# Altium PCB 0.PCB1.PcbDoc (part 6 of 12)
Units mm, origin at the board's own origin, x right, y up, seen from the top; angles counter-clockwise.
Board outline 77 x 72 mm, 6 copper layers (Top Layer, Layer 1, Layer 3, Layer 4, Layer 2, Bottom Layer), stack 1.538 mm thick; 570 components, 490 nets, 3331 pads, 1909 vias.
Unrouted connection lines stored in the file: 2.
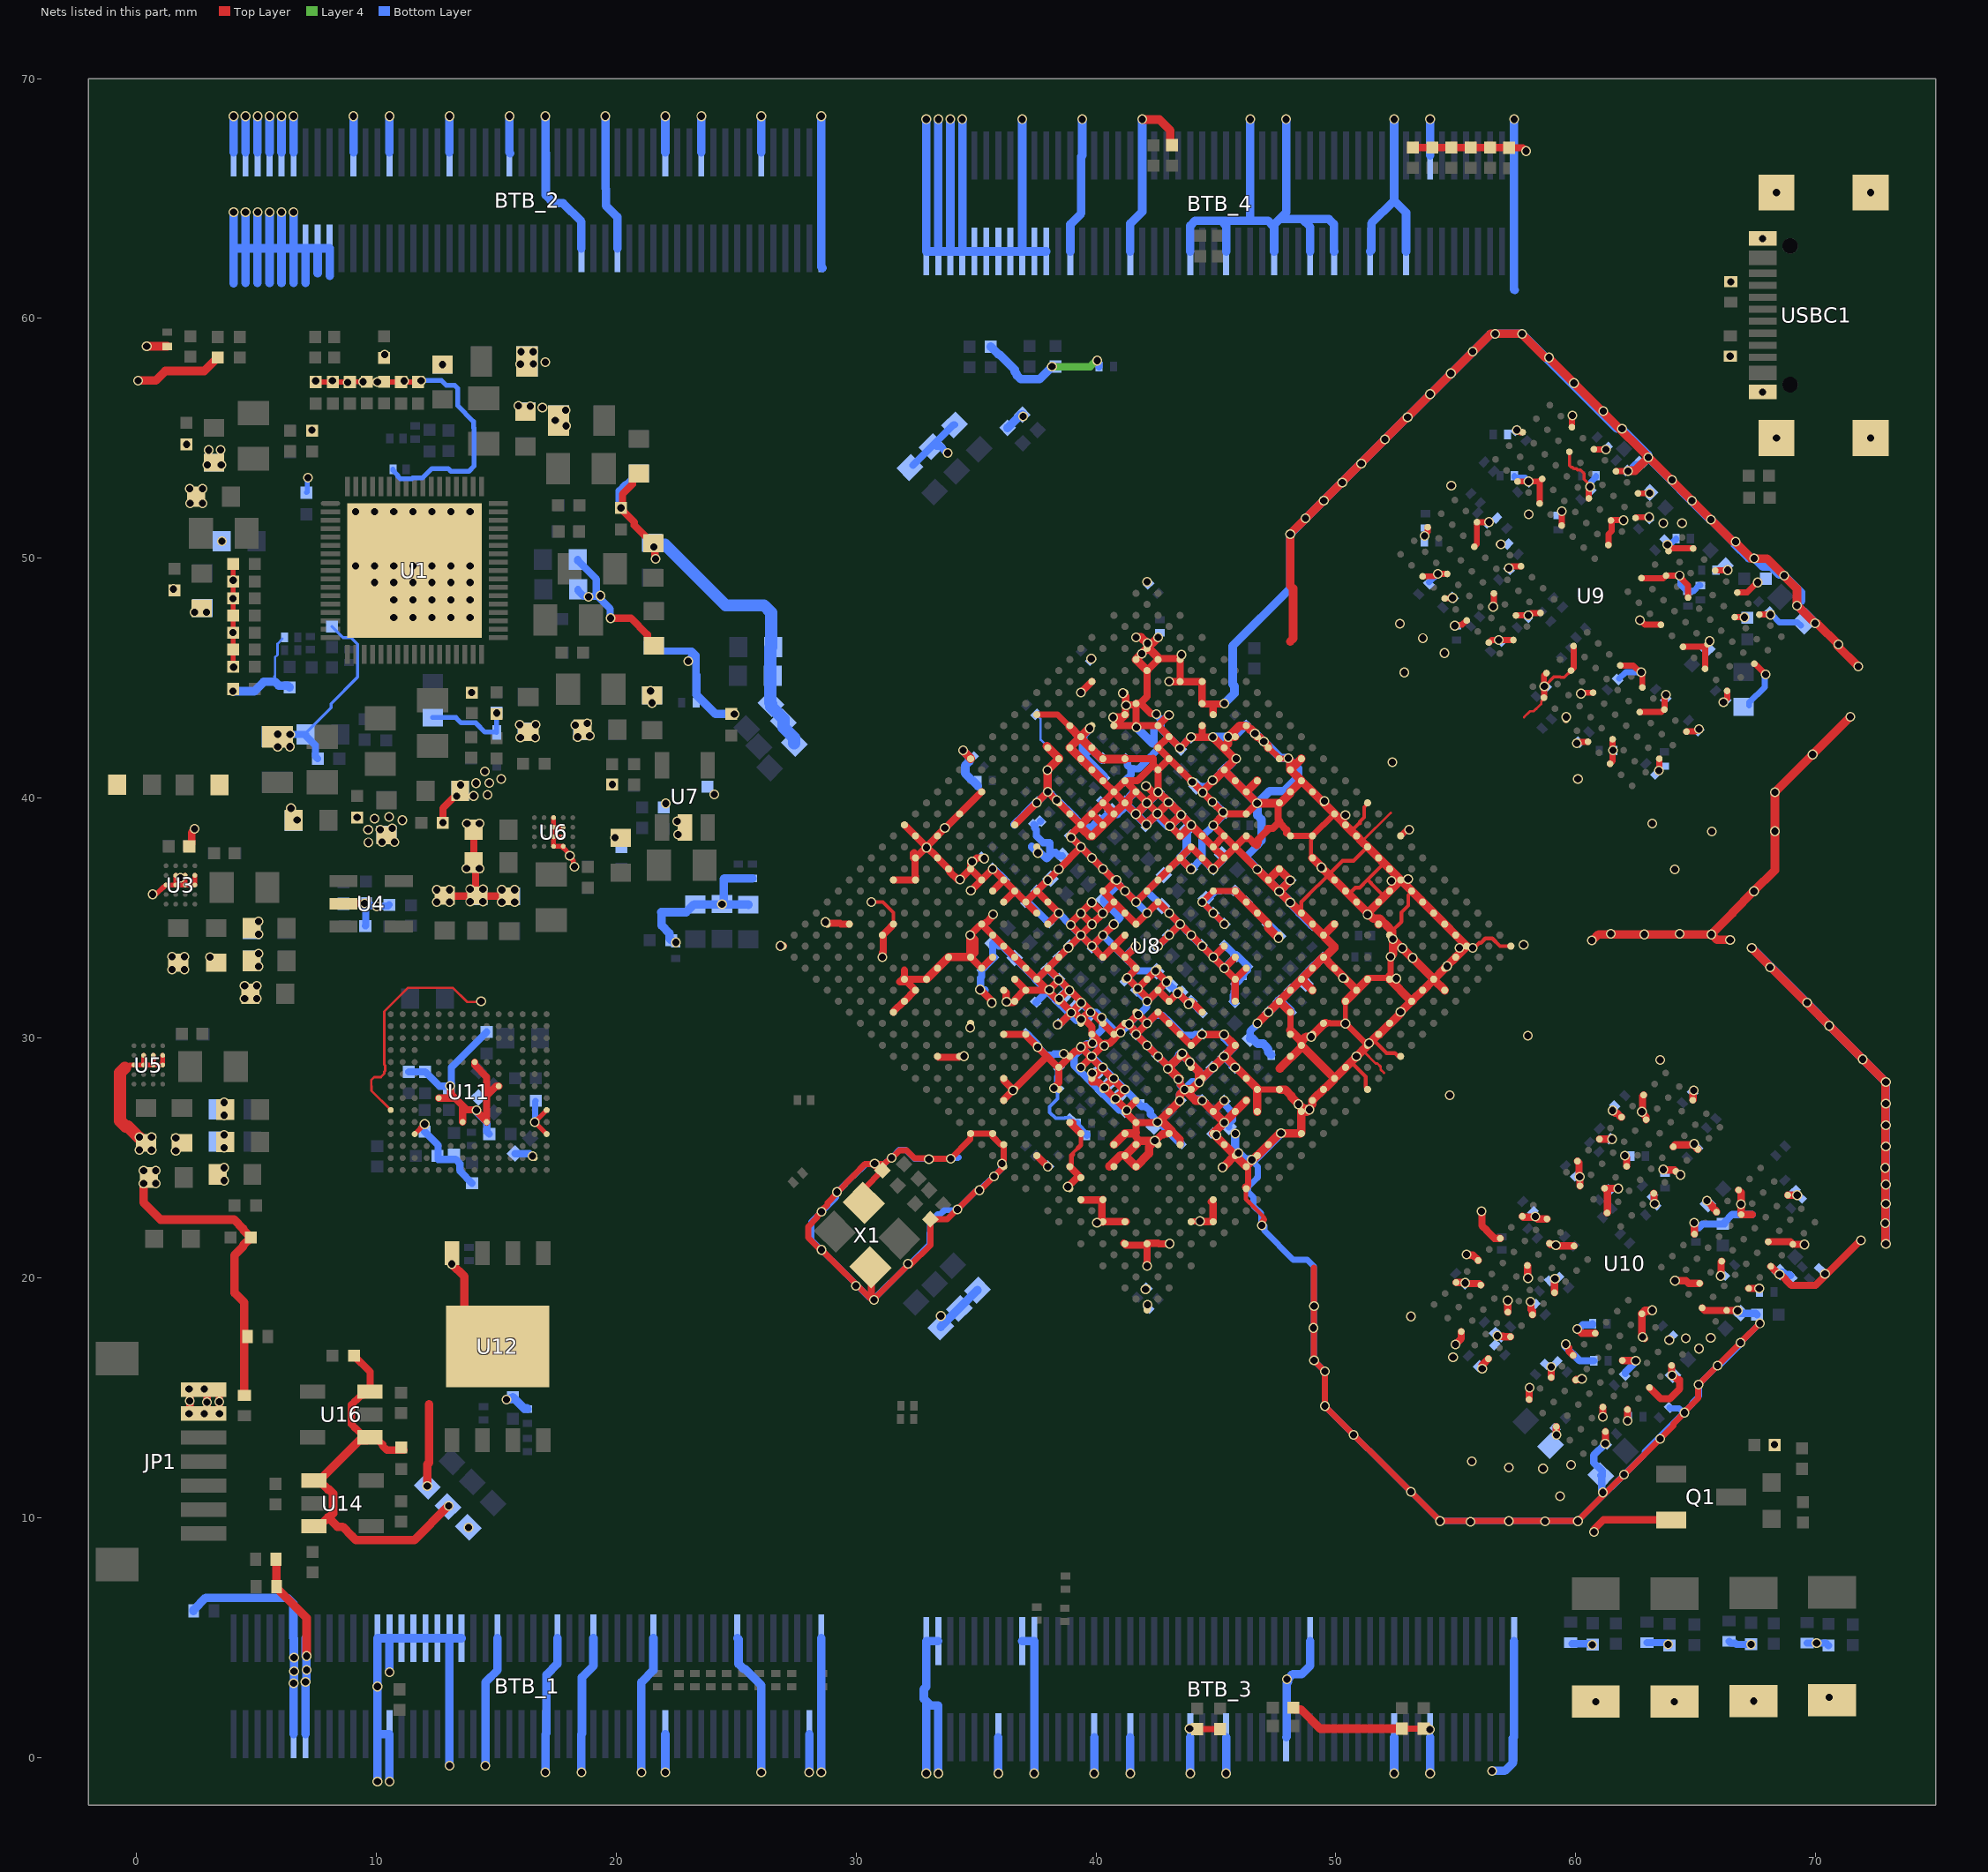
[diagram p10: the nets of this part, all layers, seen from the top]

## Via types
v1: diameter 0.41, hole 0.3, Top Layer to Bottom Layer, tented both sides, 1901 vias
v2: diameter 0.41, hole 0.3, Top Layer to Bottom Layer, 8 vias

## Nets (pads, with @x,y where several pads share a name; then routed paths per layer and width w, separated by ;. In a path a pad name is that pad's centre, name@x,y a point inside that pad or via, vN(x,y) a via of type N, cw(c..) or ccw(c..) an arc to the next point about the centre after c; other vN are vias at no path point) (continued)
GND: BTB_1.6 BTB_1.7 BTB_1.13 BTB_1.14 BTB_1.15 BTB_1.16 BTB_1.17 BTB_1.18 BTB_1.19 BTB_1.20 BTB_1.23 BTB_1.28 BTB_1.31 BTB_1.36 BTB_1.43 BTB_1.50 BTB_1.51 BTB_1.52 BTB_1.56 BTB_1.64 BTB_1.66 BTB_1.71 BTB_1.74 BTB_1.79 BTB_1.82 BTB_1.87 BTB_1.88 BTB_1.94 BTB_1.95 BTB_2.1 BTB_2.2 BTB_2.3 BTB_2.4 BTB_2.5 BTB_2.6 BTB_2.11 BTB_2.14 BTB_2.19 BTB_2.24 BTB_2.27 BTB_2.32 BTB_2.37 BTB_2.40 BTB_2.45 BTB_2.50 BTB_2.51 BTB_2.68 BTB_2.71 BTB_2.92 BTB_2.93 BTB_2.94 BTB_2.95 BTB_2.96 BTB_2.97 BTB_2.98 BTB_2.99 BTB_2.100 BTB_3.1 BTB_3.2 BTB_3.9 BTB_3.10 BTB_3.33 BTB_3.50 BTB_3.51 BTB_3.58 BTB_3.61 BTB_3.70 BTB_3.75 BTB_3.78 BTB_3.83 BTB_3.86 BTB_3.91 BTB_3.94 BTB_3.99 BTB_3.100 BTB_4.1 BTB_4.2 BTB_4.3 BTB_4.4 BTB_4.9 BTB_4.14 BTB_4.19 BTB_4.28 BTB_4.31 BTB_4.40 BTB_4.43 BTB_4.50 BTB_4.51 BTB_4.60 BTB_4.63 BTB_4.66 BTB_4.68 BTB_4.71 BTB_4.75 BTB_4.78 BTB_4.83 BTB_4.88 BTB_4.90 BTB_4.91 BTB_4.92 BTB_4.93 BTB_4.94 BTB_4.95 BTB_4.96 BTB_4.97 BTB_4.98 BTB_4.99 BTB_4.100 C1.2 C2.1 C3.2 C4.1 C5.1 C6.1 C7.1 C8.1 C11.1 C12.1 C13.1 C14.1 C15.1 C16.1 C17.1 C18.1 C19.2 C20.2 C21.1 C22.1 C23.1 C24.1 C27.1 C28.1 C29.1 C30.1 C31.1 C32.1 C33.1 C34.1 C35.1 C36.1 C37.2 C38.2 C39.1 C40.1 C41.1 C44.1 C45.1 C46.1 C47.1 C48.2 C49.2 C50.2 C51.1 C52.1 C53.1 C54.1 C56.1 C57.1 C58.1 C59.1 C60.1 C61.2 C62.2 C63.1 C64.1 C65.1 C66.1 C67.1 C68.1 C69.1 C72.1 C73.1 C74.1 C75.1 C76.1 C77.1 C78.1 C79.1 C80.1 C81.1 C83.1 C84.1 C85.1 C86.1 C87.1 C88.1 C89.1 C90.1 C91.2 C93.1 C94.1 C96.1 C97.1 C98.1 C99.1 C100.1 C101.1 C102.1 C103.1 C104.1 C105.1 C106.1 C107.1 C108.1 C109.1 C110.1 C111.1 C112.1 C113.1 C114.1 C115.1 C116.1 C117.1 C118.1 C119.1 C120.1 C121.1 C122.1 C123.1 C124.1 C125.1 C126.1 C127.1 C128.1 C129.1 C130.1 C131.1 C132.1 C133.1 C134.1 C135.1 C136.1 C137.1 C138.1 C139.1 C140.1 C141.1 C142.1 C143.1 C144.1 C145.1 C146.1 C147.1 C148.1 C149.1 C150.1 C151.1 C152.1 C153.1 C154.1 C155.1 C156.1 C157.1 C158.1 C159.1 C160.1 C161.1 C162.1 C163.1 C164.1 C165.1 C166.1 C167.1 C168.1 C169.1 C170.1 C171.1 C172.1 C173.1 C174.1 C175.1 C176.1 C177.1 C178.1 C179.1 C180.1 C181.1 C182.1 C183.1 C184.1 C185.1 C186.1 C187.1 C188.1 C189.1 C190.1 C191.1 C192.1 C193.1 C194.1 C195.1 C196.1 C197.1 C198.1 C199.1 C200.1 C201.1 C202.1 C203.1 C204.1 C205.1 C206.1 C207.1 C208.1 C209.1 C210.1 C211.1 C212.1 C213.1 C214.1 C215.1 C216.1 C217.1 C218.1 C219.1 C220.1 C221.1 C222.1 C223.1 C224.1 C225.1 C226.1 C227.1 C228.1 C229.1 C230.2 C231.2 C232.2 C233.2 C234.2 C237.1 C239.1 C240.1 C241.1 C242.2 C244.1 C245.1 C248.1 C249.1 C252.1 C253.1 C256.1 C257.1 C260.1 C262.1 C263.1 C264.1 C265.1 C266.1 C267.1 C270.1 C272.1 C273.1 C274.1 C277.1 C278.1 C279.1 C280.1 C281.1 C282.1 C283.1 C284.1 C285.1 C286.1 C287.1 C288.1 C291.1 C292.1 C293.1 C294.1 C295.1 C296.1 C297.1 C298.1 C299.1 C300.1 C301.1 C302.1 C303.1 C304.1 C305.1 C306.1 C307.1 C308.1 C309.1 C310.1 C311.1 C312.1 C313.1 C314.1 C315.1 C316.1 C317.1 C318.1 C319.1 C320.1 C321.1 C322.1 C323.1 C324.1 C325.1 C326.1 C327.1 C328.1 C329.1 C330.1 C331.1 C332.1 C333.1 C334.1 C335.1 C336.1 C337.1 C338.1 C339.1 C340.1 C341.1 C342.1 C343.1 C344.1 C345.1 C346.1 C347.1 C348.1 C349.1 C350.1 C351.1 C352.1 C353.1 C354.1 C355.1 C356.1 C357.1 C358.1 C359.1 C360.1 C361.1 C362.1 C363.1 C364.1 C365.1 C366.1 C367.1 C368.1 C369.1 C370.1 C371.1 C372.1 C373.1 C374.1 C375.1 C376.1 C377.1 C378.1 C379.1 C380.1 C381.1 C382.1 C383.1 C384.1 C385.2 C386.2 C387.2 C388.2 C389.2 C390.2 C391.2 C392.2 C393.1 C394.1 C395.1 C396.1 C397.1 C398.2 C399.2 C400.1 C401.1 C402.1 C403.1 JP1.6 JP1.7 Q1.2 R5.1 R9.1 R11.1 R13.1 R15.1 R17.1 R22.1 R23.1 R28.1 R40.1 R42.1 R50.1 R54.2 R55.2 R56.2 R57.2 R58.2 R59.2 R63.1 R64.1 R69.2 R70.2 R72.2 R73.2 R108.1 R120.1 R121.1 R124.1 R125.1 R134.1 R137.2 R139.2 R140.2 R141.2 R143.2 R144.2 R145.2 R146.2 SW1.1 SW2.1 SW3.1 SW4.1 U1.69 U2.2 U3.B2 U3.B3 U3.B4 U3.C1 U3.C2 U3.C3 U3.C4 U4.2 U5.B2 U5.B3 U5.B4 U5.C1 U5.C2 U5.C3 U5.C4 U6.B2 U6.B3 U6.B4 U6.C1 U6.C2 U6.C3 U6.C4 U7.2 U8.A1 U8.A11 U8.A14 U8.A34 U8.AA3 U8.AA6 U8.AA8 U8.AA10 U8.AA11 U8.AA16 U8.AA17 U8.AA18 U8.AA19 U8.AA20 U8.AA21 U8.AA22 U8.AA23 U8.AA24 U8.AA25 U8.AA26 U8.AA31 U8.AB3 U8.AB5 U8.AB6 U8.AB7 U8.AB8 U8.AB10 U8.AB11 U8.AB16 U8.AB17 U8.AB18 U8.AB19 U8.AB20 U8.AB24 U8.AB25 U8.AB26 U8.AB27 U8.AB29 U8.AB32 U8.AC3 U8.AC4 U8.AC5 U8.AC8 U8.AC10 U8.AC11 U8.AC12 U8.AC16 U8.AC20 U8.AC21 U8.AC24 U8.AC27 U8.AD5 U8.AD8 U8.AD10 U8.AD11 U8.AD12 U8.AD16 U8.AD20 U8.AD21 U8.AD24 U8.AD25 U8.AD26 U8.AE3 U8.AE4 U8.AE5 U8.AE6 U8.AE7 U8.AE8 U8.AE9 U8.AE11 U8.AE12 U8.AE13 U8.AE14 U8.AE15 U8.AE16 U8.AE18 U8.AE19 U8.AE20 U8.AE21 U8.AE24 U8.AE26 U8.AF4 U8.AF7 U8.AF8 U8.AF11 U8.AF12 U8.AF13 U8.AF14 U8.AF15 U8.AF16 U8.AF21 U8.AF22 U8.AF24 U8.AF25 U8.AF27 U8.AF28 U8.AF29 U8.AF30 U8.AF31 U8.AF32 U8.AG3 U8.AG6 U8.AG7 U8.AG10 U8.AG12 U8.AG15 U8.AG18 U8.AG21 U8.AG22 U8.AG30 U8.AH4 U8.AH8 U8.AH11 U8.AH12 U8.AH15 U8.AH21 U8.AH22 U8.AH23 U8.AJ3 U8.AJ7 U8.AJ8 U8.AJ9 U8.AJ11 U8.AJ12 U8.AJ15 U8.AJ16 U8.AJ18 U8.AJ21 U8.AJ22 U8.AJ23 U8.AJ30 U8.AK4 U8.AK5 U8.AK7 U8.AK10 U8.AK11 U8.AK12 U8.AK13 U8.AK14 U8.AK23 U8.AK28 U8.AK29 U8.AL3 U8.AL4 U8.AL5 U8.AL11 U8.AL13 U8.AL23 U8.AL25 U8.AM4 U8.AM8 U8.AM9 U8.AM18 U8.AM20 U8.AM22 U8.AM23 U8.AM24 U8.AM26 U8.AM28 U8.AM30 U8.AN7 U8.AN12 U8.AN23 U8.AN31 U8.AP1 U8.AP17 U8.AP23 U8.AP34 U8.B6 U8.B19 U8.B24 U8.B27 U8.B33 U8.C3 U8.C4 U8.C5 U8.C6 U8.C7 U8.C8 U8.C9 U8.C10 U8.C11 U8.C12 U8.C13 U8.C14 U8.C15 U8.C16 U8.C17 U8.C18 U8.C20 U8.C21 U8.C22 U8.C23 U8.C26 U8.C28 U8.C30 U8.C32 U8.D3 U8.D23 U8.D24 U8.D31 U8.E3 U8.E6 U8.E8 U8.E12 U8.E18 U8.E20 U8.E22 U8.E23 U8.E32 U8.F3 U8.F7 U8.F9 U8.F10 U8.F11 U8.F13 U8.F14 U8.F15 U8.F16 U8.F19 U8.F20 U8.F21 U8.F22 U8.F23 U8.F31 U8.G3 U8.G6 U8.G10 U8.G15 U8.G19 U8.G21 U8.G22 U8.G25 U8.G32 U8.H3 U8.H6 U8.H10 U8.H12 U8.H14 U8.H19 U8.H22 U8.H25 U8.H26 U8.H28 U8.H31 U8.J3 U8.J4 U8.J5 U8.J6 U8.J10 U8.J11 U8.J12 U8.J13 U8.J14 U8.J15 U8.J16 U8.J18 U8.J19 U8.J20 U8.J21 U8.J22 U8.J23 U8.J24 U8.J25 U8.J27 U8.J28 U8.J29 U8.J32 U8.K3 U8.K6 U8.K8 U8.K9 U8.K18 U8.K21 U8.K22 U8.K26 U8.K27 U8.K28 U8.K31 U8.K32 U8.L1 U8.L3 U8.L6 U8.L9 U8.L16 U8.L19 U8.L20 U8.L21 U8.L22 U8.L25 U8.L26 U8.L31 U8.M3 U8.M6 U8.M9 U8.M11 U8.M14 U8.M15 U8.M18 U8.M20 U8.M22 U8.M25 U8.M26 U8.M29 U8.M32 U8.N3 U8.N6 U8.N9 U8.N11 U8.N14 U8.N15 U8.N18 U8.N20 U8.N22 U8.N25 U8.N26 U8.N29 U8.N32 U8.P1 U8.P3 U8.P6 U8.P8 U8.P9 U8.P11 U8.P14 U8.P15 U8.P18 U8.P19 U8.P20 U8.P21 U8.P22 U8.P25 U8.P26 U8.P34 U8.R3 U8.R5 U8.R8 U8.R9 U8.R11 U8.R13 U8.R15 U8.R18 U8.R19 U8.R20 U8.R21 U8.R22 U8.R23 U8.R24 U8.R25 U8.R26 U8.R28 U8.R33 U8.T3 U8.T6 U8.T9 U8.T11 U8.T13 U8.T15 U8.T18 U8.T19 U8.T20 U8.T23 U8.T24 U8.T25 U8.T26 U8.T27 U8.T33 U8.U3 U8.U12 U8.U13 U8.U15 U8.U16 U8.U17 U8.U19 U8.U20 U8.U23 U8.U24 U8.U30 U8.U31 U8.U34 U8.V3 U8.V4 U8.V5 U8.V8 U8.V9 U8.V10 U8.V11 U8.V15 U8.V18 U8.V19 U8.V23 U8.V24 U8.V25 U8.V27 U8.V30 U8.W2 U8.W3 U8.W6 U8.W7 U8.W9 U8.W10 U8.W11 U8.W12 U8.W15 U8.W16 U8.W17 U8.W18 U8.W19 U8.W20 U8.W23 U8.W24 U8.W27 U8.Y3 U8.Y5 U8.Y6 U8.Y8 U8.Y9 U8.Y10 U8.Y11 U8.Y12 U8.Y13 U8.Y14 U8.Y15 U8.Y16 U8.Y17 U8.Y18 U8.Y19 U8.Y20 U8.Y23 U8.Y24 U8.Y28 U9.A3 U9.A10 U9.AB3 U9.AB5 U9.AB8 U9.AB10 U9.C1 U9.C5 U9.C8 U9.C12 U9.D2 U9.D4 U9.D9 U9.D11 U9.E1 U9.E5 U9.E8 U9.E12 U9.G1 U9.G3 U9.G5 U9.G8 U9.G10 U9.G12 U9.J1 U9.J3 U9.J10 U9.J12 U9.K2 U9.K4 U9.K9 U9.K11 U9.N2 U9.N4 U9.N9 U9.N11 U9.P1 U9.P3 U9.P10 U9.P12 U9.T1 U9.T3 U9.T5 U9.T8 U9.T10 U9.T12 U9.V1 U9.V5 U9.V8 U9.V12 U9.W2 U9.W4 U9.W9 U9.W11 U9.Y1 U9.Y5 U9.Y8 U9.Y12 U10.A3 U10.A10 U10.AB3 U10.AB5 U10.AB8 U10.AB10 U10.C1 U10.C5 U10.C8 U10.C12 U10.D2 U10.D4 U10.D9 U10.D11 U10.E1 U10.E5 U10.E8 U10.E12 U10.G1 U10.G3 U10.G5 U10.G8 U10.G10 U10.G12 U10.J1 U10.J3 U10.J10 U10.J12 U10.K2 U10.K4 U10.K9 U10.K11 U10.N2 U10.N4 U10.N9 U10.N11 U10.P1 U10.P3 U10.P10 U10.P12 U10.T1 U10.T3 U10.T5 U10.T8 U10.T10 U10.T12 U10.V1 U10.V5 U10.V8 U10.V12 U10.W2 U10.W4 U10.W9 U10.W11 U10.Y1 U10.Y5 U10.Y8 U10.Y12 U11.A6 U11.C4 U11.E7 U11.G5 U11.H10 U11.J5 U11.K8 U11.N2 U11.N5 U11.P4 U11.P6 U12.4 U12.9 U13.1 U14.1 U14.3 U15.1 U16.1 U16.3 U17.1 U18.1 U19.1 U20.1 U21.1 U22.1 U23.1 U24.1 U25.1 USBC1.13 USBC1.14 USBC1.15 USBC1.16 USBC1.A1B12 USBC1.B1A12 X1.2 X1.4 | length 1317.1
  Top Layer w0.102: U11.A6@10.602,26.991 9.796,27.797 9.796,27.996 9.788,28.004 9.788,28.238 9.915,28.364 9.982,28.364 10.192,28.365 10.335,28.507 10.335,28.601 10.366,28.633 10.366,28.849 10.335,28.88 10.335,31.101 11.324,32.091 13.191,32.091 13.781,31.5 14.342,31.5 v1(14.368,31.527) ; 51.093,38.192 52.281,39.381 52.293,39.381 ; 51.122,29.488 51.392,29.218 51.392,29.207 51.661,28.937 51.732,28.937 51.873,28.796 51.873,28.682 52.014,28.541 ; 57.847,43.369 58.097,43.618 58.247,43.618 58.346,43.717 58.36,43.717 58.564,43.921 58.564,44.025 58.676,44.137 U9.P1@58.676,44.185
  Top Layer w0.127: v1@58.658,44.778 58.676,44.76 58.688,44.748 58.788,44.748 59.086,45.046 59.364,45.046 59.371,45.038 59.529,45.038 U9.P3@59.807,45.317 ; U9.D11@59.737,54.438 59.737,53.869 59.811,53.795 59.87,53.795 59.938,53.726 60.031,53.726 60.074,53.684 60.202,53.684 60.35,53.536 60.35,53.293 60.548,53.094 v1@60.548,53.046
  Top Layer w0.142: v1(30.64,35.664) 31.117,35.664 31.559,35.222 U8.AK28@31.559,34.814 ; 39.034,25.144 39.034,25.197 39.243,25.406
  Top Layer w0.156: 46.407,23.122 46.998,22.532 46.998,22.439 ; U8.M9@48.565,35.205 48.565,35.671 49.239,36.345 49.245,36.345 49.651,36.752 49.651,36.853 ; U8.P6@48.965,37.539 48.965,38.237 48.997,38.269 48.997,38.394 U8.R5@49.025,38.422 ; 49.727,36.904 49.798,36.904 50.28,37.387 50.744,37.387 51.32,37.962 U8.M3@51.323,37.962 ; 50.566,36.015 50.815,36.264 50.996,36.264 51.329,36.598 ; 50.651,38.633 50.96,38.942 51.003,38.942 51.003,39.014 51.183,39.193 51.183,39.622 51.323,39.762 U8.P1@51.323,39.801 ; 50.722,28.903 51.247,28.379 51.247,27.926 U8.A14@51.323,27.85 ; 51.583,29.957 51.583,29.896 52.11,29.369 52.462,29.369 52.574,29.257 52.674,29.257 U8.A11@52.701,29.229 ; 51.918,37.367 51.918,37.186 51.329,36.598 ; 51.988,35.964 51.949,35.964 51.463,36.451 51.463,36.464 51.329,36.598 ; 52.132,34.642 52.132,34.664 ; 52.347,34.449 52.74,34.843 52.74,35.235 53.021,35.517 53.021,35.945 53.161,36.085 U8.H3@53.161,36.124 ; v1(55.705,33.758) 55.774,33.758 55.981,33.965 56.051,33.965 56.231,34.145 56.526,34.145 56.846,33.826 U8.A1@57.298,33.826
  Top Layer w0.182: U8.B24@46.248,23.721 46.248,23.282 46.407,23.122
  Top Layer w0.192: 39.243,25.406 39.372,25.535 U8.M29@39.372,26.012
  Top Layer w0.202: U8.L31@38.983,24.636 38.983,25.093 39.034,25.144
  Top Layer w0.203: -0.276,28.871 U5.C1@-0.101,28.871 U5.C2@0.299,28.871 ; U5.B2@0.299,29.271 U5.C2@0.299,28.871 ; v1(0.677,35.987) 0.717,36.027 0.857,36.027 1.111,36.281 1.142,36.281 U3.C1@1.237,36.376 U3.C2@1.637,36.376 ; U5.B3@0.699,29.271 U5.C3@0.699,28.871 ; U5.B4@1.099,29.271 U5.C4@1.099,28.871 U5.C3@0.699,28.871 ; U3.B2@1.637,36.776 U3.C2@1.637,36.376 ; U3.B3@2.037,36.776 U3.C3@2.037,36.376 ; U3.B4@2.437,36.776 U3.C4@2.437,36.376 U3.C3@2.037,36.376 ; C36.1@4.036,49.57 v1(4.036,49.083) C35.1@4.036,49.031 4.036,45.508 C21.1@4.041,45.503 ; v1(7.476,57.393) 7.521,57.348 C16.1@8.898,57.348 8.902,57.352 9.363,57.352 C2.1@9.366,57.355 ; v1(9.448,57.356) C2.1@9.609,57.355 9.612,57.353 10.043,57.353 v1(10.046,57.35) 10.048,57.353 10.316,57.353 10.32,57.348 C5.1@11.032,57.348 C15.1@11.743,57.348 11.794,57.4 v1(11.868,57.4) ; U11.C4@11.602,25.991 v1(12.014,26.403) ; U11.P4@17.102,25.991 v1(16.602,26.491) U11.P6@17.102,26.991 ; U6.C1@17.393,39.184 U6.C2@17.393,38.784 ; U6.B3@17.793,38.384 U6.C3@17.393,38.384 ; U6.B2@17.793,38.784 U6.C2@17.393,38.784 ; v1(18.259,37.131) 18.219,37.171 18.219,37.384 18.066,37.537 18.066,37.649 17.793,37.922 U6.B4@17.793,37.984 U6.C4@17.393,37.984 U6.C3@17.393,38.384 ; 42.819,25.906 42.866,25.953 42.964,25.953 43.023,26.012 43.028,26.016 43.045,26.016 43.156,26.127 43.175,26.147 ; U5.C2@0.299,28.871 U5.C3@0.699,28.871 ; U3.C2@1.637,36.376 U3.C3@2.037,36.376 ; U6.C3@17.393,38.384 U6.C2@17.393,38.784
  Top Layer w0.213: v1(50.4,30.599) 50.404,30.603 U8.E12@50.404,30.608 U8.F11@50.404,31.527
  Top Layer w0.254: 28.382,22.564 28.382,22.511 28.006,22.135 28.006,21.676 28.476,21.206 28.521,21.206 v1(28.565,21.162) 30.616,19.111 30.716,19.111 v1(30.754,19.073) ; v1@28.43,22.612 v1(28.565,22.747) 28.565,22.8 28.809,23.044 28.809,23.125 29.206,23.521 v1(29.206,23.574) ; v1@29.214,23.568 29.883,24.237 29.897,24.237 ; 29.901,24.254 29.901,24.269 30.372,24.739 31.179,24.739 31.442,25.002 v1(31.484,25.002) ; X1.4@30.32,23.121 30.32,23.697 C172.1@31.101,24.478 30.963,24.478 v1@30.701,24.739 ; v1@30.755,24.739 v1(30.776,24.76) ; v1@30.783,19.15 32.163,20.53 v1(32.163,20.577) ; v1@31.541,25.068 31.575,25.068 31.822,25.315 32.104,25.315 32.441,24.978 33.002,24.978 v1(33.04,24.941) ; v1@32.24,20.501 33.102,21.363 33.102,21.885 33.094,21.893 ; v1@33.04,24.953 33.941,24.953 34.768,25.78 34.768,26.003 U8.U34@34.777,26.012 U8.T33@35.687,26.012 ; 33.102,21.901 C174.1@33.102,22.44 33.807,22.44 34.213,22.847 v1(34.229,22.847) ; v1@34.23,22.846 34.999,23.615 35.118,23.615 v1(35.148,23.645) ; v1@35.161,23.633 v1(35.757,24.229) ; U8.T33@35.687,26.011 35.687,25.9 36.035,25.552 U8.R33@36.155,25.552 36.155,24.883 36.088,24.816 v1(36.088,24.763) ; v1@35.755,24.232 U8.P34@36.155,24.633 ; U8.AN12@37.534,43.477 38.399,43.477 U8.AL11@38.913,42.964 ; v1(43.911,1.192) 43.917,1.186 44.21,1.186 R121.1@44.216,1.18 R120.1@45.181,1.18 ; U8.C28@43.969,22.335 43.978,22.344 44.319,22.344 v1(44.334,22.358) ; v1(45.346,34.74) 45.346,34.746 44.433,35.659 v1(44.427,35.659) 44.427,35.662 U8.U12@44.888,36.123 U8.T11@45.807,36.123 ; U8.B24@46.267,23.778 46.35,23.861 46.35,24.538 46.267,24.621 U8.C23@46.267,24.633 ; U8.F19@46.724,27.844 U8.E18@47.525,27.844 ; v1(46.919,22.185) 46.949,22.215 46.949,22.358 47.014,22.423 46.998,22.439 ; U8.AA3@47.193,42.105 U8.Y3@47.646,41.653 ; U8.Y3@47.646,41.639 47.655,41.648 48.002,41.648 v1(48.015,41.661) ; 48.104,30.313 U8.H14@48.104,31.064 ; U8.T6@48.106,38.422 49.015,38.422 49.477,38.884 49.487,38.884 U8.R3@49.944,39.341 ; 49.092,20.419 v1(49.092,18.819) v1(49.092,16.559) v1(49.55,16.101) 49.55,14.647 v1(50.743,13.452) ; U8.F13@49.581,30.62 49.752,30.62 49.764,30.608 50.391,30.608 v1(50.4,30.599) 50.412,30.599 51.217,29.795 U8.C12@51.323,29.689 ; v1@50.764,13.435 51.946,12.253 51.95,12.253 v1(53.131,11.072) v1(54.35,9.853) v1(57.22,9.853) 58.71,9.853 v1(58.72,9.843) ; U8.F9@51.384,32.508 U8.E8@52.193,32.508 ; 52.217,32.611 52.288,32.683 v1(52.288,33.389) ; U8.L1@52.701,38.422 52.714,38.422 52.946,38.654 53.023,38.654 v1(53.053,38.684) ; R124.1@52.75,1.198 R125.1@53.664,1.198 53.68,1.182 53.902,1.182 v1(53.918,1.166) ; U9.C1@53.62,49.241 53.625,49.246 54.092,49.246 54.196,49.35 v1(54.249,49.35) 54.25,49.349 U9.D2@54.646,49.347 U9.D2@54.646,49.347 ; v1(53.708,50.925) 53.708,50.978 53.827,51.098 53.827,51.287 U9.A3@53.832,51.292 ; U9.E1@54.539,48.322 54.544,48.327 54.853,48.327 v1(54.872,48.346) ; v1(54.964,47.187) 55.001,47.224 55.273,47.224 55.452,47.402 U9.G1@55.459,47.402 ; U9.D4@55.777,50.478 55.777,50.485 55.883,50.592 U9.C5@55.883,51.504 56.377,51.504 v1(56.382,51.509) ; U9.J1@56.378,46.483 56.385,46.483 56.491,46.589 v1(56.789,46.589) U9.K2@57.403,46.589 ; v1(56.562,47.978) 56.585,48.001 56.585,48.529 U9.G3@56.59,48.534 ; U9.E5@56.802,50.584 56.88,50.584 v1(56.881,50.583) ; v1(57.212,49.59) 57.254,49.59 57.324,49.66 57.716,49.66 U9.G5@57.721,49.665 ; U9.J3@57.509,47.615 57.513,47.618 58.015,47.618 v1(58.018,47.622) ; v1(57.546,55.35) 57.589,55.35 57.682,55.256 57.787,55.256 U9.A10@57.792,55.251 ; U9.C8@57.58,53.201 v1(58.033,53.201) 58.492,53.201 ; v1@58.029,47.62 58.125,47.716 58.53,47.716 U9.K4@58.535,47.721 ; U9.E8@58.499,52.282 58.499,53.194 58.492,53.201 ; U9.D9@58.605,53.307 58.598,53.307 58.492,53.201 ; U9.P1@58.676,44.185 58.676,44.192 58.693,44.209 58.693,44.565 58.696,44.568 v1(58.696,44.656) ; v1@58.676,44.641 58.676,44.76 58.676,45.097 58.782,45.203 U9.N2@58.782,45.21 ; v1@58.719,9.853 v1(60.091,9.853) 63.526,13.288 64.07,13.832 64.07,13.909 v1(64.536,14.375) ; U9.G8@59.419,51.362 59.421,51.365 59.421,51.96 v1(59.424,51.963) ; U9.T1@59.595,43.266 59.595,43.368 v1(59.608,43.381) ; U9.P3@59.807,45.317 59.807,45.324 59.913,45.43 U9.N4@59.913,46.342 ; U9.C12@59.843,55.463 59.843,55.935 v1(59.862,55.954) ; v1(60.049,42.28) 60.102,42.28 60.164,42.342 60.51,42.342 U9.V1@60.515,42.347 ; v1(60.224,44.354) 60.266,44.354 60.305,44.392 60.722,44.392 U9.T3@60.727,44.397 ; U9.G10@60.55,52.494 60.55,52.933 v1(60.599,52.982) ; U9.E12@60.762,54.544 60.764,54.542 61.257,54.542 v1(61.26,54.539) ; U9.K9@61.363,50.549 61.368,50.554 61.368,51.008 61.497,51.137 U9.J10@61.497,51.585 ; U9.Y1@61.434,41.427 61.434,41.434 61.54,41.541 61.54,41.978 v1(61.559,41.997) ; U9.J10@61.469,51.574 61.474,51.579 61.491,51.579 U9.J10@61.497,51.585 ; v1@61.54,41.997 U9.W2@61.54,42.453 ; U9.G12@61.681,53.625 61.686,53.63 62.171,53.63 v1(62.176,53.634) ; U9.T5@61.858,45.529 62.405,45.529 62.688,45.246 v1(62.73,45.246) 62.73,45.204 62.777,45.156 U9.V5@62.777,44.609 ; v1(61.996,51.585) U9.J10@61.497,51.585 ; U9.K11@62.494,51.68 62.526,51.712 v1(63.062,51.712) ; U9.J12@62.6,52.706 63.085,52.706 63.085,52.712 v1(63.088,52.715) ; U9.W4@62.671,43.584 63.583,43.584 63.701,43.702 63.701,44.196 63.766,44.26 v1(63.766,44.303) ; v1(62.681,47.42) 62.875,47.226 U9.T8@63.555,47.226 ; U9.N9@62.742,49.17 63.654,49.17 63.76,49.276 U9.P10@63.767,49.276 64.323,49.276 v1(64.328,49.281) 64.328,49.228 64.681,48.874 64.681,48.362 U9.T10@64.686,48.357 ; v1(63.469,41.145) 63.479,41.156 63.479,41.635 U9.AB3@63.484,41.64 ; 63.986,50.408 U9.P12@64.899,50.408 ; U9.V8@64.474,46.306 65.387,46.306 ; v1@64.536,14.4 65.108,14.972 65.108,15.527 v1(65.122,15.541) ; U9.AB5@64.616,42.771 64.621,42.776 64.995,42.776 65.092,42.873 v1(65.145,42.873) ; v1@65.145,15.541 65.145,15.564 v1(65.915,16.335) ; U9.Y8@65.394,45.387 65.394,46.299 65.498,46.404 65.501,46.404 U9.W9@65.501,46.411 ; U9.W9@65.5,46.413 U9.W9@65.501,46.411 ; v1(65.578,46.546) 65.549,46.516 65.549,46.469 65.501,46.421 U9.W9@65.501,46.411 ; U9.T12@65.818,49.488 66.325,49.488 v1(66.339,49.502) ; v1@65.939,16.335 65.939,16.36 66.849,17.27 66.898,17.27 66.898,17.319 67.673,18.093 v1(67.674,18.093) ; v1(66.161,43.991) 66.313,44.142 U9.AB8@66.313,44.468 ; U9.W11@66.631,47.544 66.634,47.541 67.036,47.541 v1(67.038,47.539) ; U9.V12@66.737,48.569 67.155,48.569 67.576,48.99 v1(67.591,48.99) ; U9.AB10@67.444,45.599 67.449,45.594 67.478,45.594 v1(67.914,45.159) ; U9.Y12@67.657,47.649 v1(68.117,47.648)
  Top Layer w0.305: JP1.6@2.161,14.35 2.227,14.416 2.227,15.321 JP1.7@2.161,15.386 ; R22.1@2.203,37.982 2.3,38.08 2.3,38.566 2.42,38.685 v1(2.42,38.714) ; JP1.6@2.796,14.333 2.798,14.333 2.946,14.481 2.946,15.185 2.798,15.333 JP1.7@2.796,15.333 ; JP1.6@3.431,14.35 3.456,14.375 3.456,15.362 JP1.7@3.431,15.386 ; U4.2@8.633,35.593 8.641,35.601 9.508,35.601 v1(9.515,35.609) ; C399.2@9.073,16.747 9.743,16.077 U16.3@9.743,15.246 U16.3@9.616,15.246 ; U16.3@9.468,15.099 U16.3@9.616,15.246 ; U16.1@9.759,13.362 U16.1@9.743,13.346 ; C398.2@11.153,12.812 10.446,12.812 10.268,12.991 10.268,13.047 9.968,13.346 U16.1@9.743,13.346 ; U11.E7@12.602,27.491 13.272,27.491 ; v1(12.777,38.973) 12.777,39.573 13.225,40.021 13.275,40.021 13.315,40.061 C23.1@13.315,40.111 ; C97.1@12.847,35.927 12.859,35.915 C98.1@14.193,35.915 ; v1(13.08,27.989) 13.1,27.969 13.1,27.693 13.161,27.632 13.161,27.601 13.272,27.491 ; v1(13.352,40.074) C23.1@13.315,40.111 ; C23.1@13.498,40.294 C23.1@13.315,40.111 ; U11.G5@13.602,26.491 13.602,27.16 ; C103.1@14.064,38.682 C101.1@14.064,37.31 14.141,37.233 14.141,35.966 C98.1@14.193,35.915 ; U11.H10@14.102,28.991 14.102,28.87 14.602,28.37 14.602,27.583 ; v1(14.178,26.978) 14.157,26.998 13.764,26.998 13.602,27.16 ; v1@14.213,26.901 14.602,26.512 U11.J5@14.602,26.491 ; U11.J5@14.602,26.592 14.602,27.583 ; U11.K8@15.102,27.991 15.01,27.991 14.602,27.583 ; C99.1@15.539,35.902 15.526,35.915 C98.1@14.193,35.915 ; v1@19.73,47.503 19.734,47.5 v1(19.765,47.5) 20.615,47.5 21.3,46.815 21.3,46.573 21.523,46.351 C68.1@21.573,46.351 ; C8.1@20.143,52.156 20.229,52.156 20.268,52.195 20.268,52.673 20.675,53.08 20.675,53.305 20.898,53.527 C13.1@20.948,53.527 ; v1(20.201,52.098) 20.299,52 20.299,51.958 20.555,51.702 ; 20.556,51.702 20.756,51.502 20.756,51.373 C7.1@21.547,50.582 ; v1(21.577,50.473) 21.577,50.475 21.547,50.505 C7.1@21.547,50.632 21.547,50.473 21.556,50.473 21.62,50.409 21.62,49.997 v1(21.64,49.977) ; U8.AP34@26.963,33.826 U8.AP34@26.968,33.831 ; v1(28.724,34.827) 28.724,34.822 U8.AN31@28.801,34.745 ; U8.AN31@28.84,34.783 29.33,34.783 29.368,34.745 U8.AM30@29.721,34.745 ; X1.2@30.603,20.434 30.638,20.399 30.638,19.219 v1@30.716,19.142 ; U8.AJ30@31.109,33.475 31.109,33.554 31.132,33.577 31.132,34.253 U8.AK29@31.099,34.285 31.111,34.285 31.457,34.631 31.457,34.64 31.559,34.742 U8.AK28@31.559,34.745 ; U8.AF32@31.559,31.068 31.559,31.096 31.991,31.527 U8.AF31@32.019,31.527 ; U8.AM26@31.559,36.583 U8.AL25@32.462,36.583 ; U8.AG30@31.977,32.488 31.82,32.332 32.133,32.332 U8.AF30@32.478,31.987 ; U8.AF31@32.013,31.527 32.467,31.981 U8.AF30@32.476,31.981 ; 32.019,32.827 U8.AG30@32.019,32.447 U8.AF29@32.938,32.447 ; U8.AP23@32.019,38.881 U8.AN23@32.479,38.422 32.935,37.965 33.7,38.73 v1(33.7,38.75) ; 32.419,37.723 32.392,37.696 32.392,37.503 32.462,37.432 32.462,36.751 32.478,36.735 U8.AL25@32.478,36.583 ; U8.AM24@32.479,37.503 U8.AM23@32.938,37.962 33.16,37.74 33.176,37.74 33.398,37.518 U8.AL23@33.398,37.503 ; U8.AB32@33.398,29.229 33.436,29.191 34.279,29.191 U8.AA31@34.317,29.229 34.497,29.229 v1(34.506,29.238) ; U8.AL23@33.452,37.463 33.452,37.448 U8.AK23@33.857,37.043 U8.AK23@33.86,37.04 ; v1@33.7,38.774 33.75,38.774 U8.AM20@34.317,39.341 U8.AM18@35.236,40.26 ; U8.AK23@33.901,37.022 33.901,36.942 34.262,36.581 34.319,36.581 34.472,36.734 34.472,36.738 U8.AJ22@34.776,37.043 ; U8.AH23@34.777,36.124 U8.AH22@35.236,36.583 ; v1(35.174,32.013) 35.2,31.987 U8.AC27@35.236,31.987 35.236,31.969 U8.AB27@35.678,31.527 ; U8.AF24@35.236,34.745 U8.AF24@35.286,34.696 ; v1(35.341,37.474) 35.353,37.486 35.337,37.503 U8.AJ21@35.236,37.503 35.038,37.503 34.776,37.241 U8.AJ22@34.776,37.043 ; v1(35.664,31.462) 35.696,31.493 U8.AB27@35.696,31.527 ; U8.AD25@35.696,33.366 U8.AD26@35.236,32.906 U8.AE26@34.776,33.366 34.961,33.551 34.961,34.1 34.771,34.29 v1(34.76,34.29) 35.162,34.693 35.283,34.693 U8.AF24@35.286,34.696 ; U8.AG22@35.696,36.124 U8.AG21@36.155,36.583 ; v1(35.716,35.152) 35.716,35.124 35.608,35.016 35.608,34.98 35.45,34.822 35.412,34.822 U8.AF24@35.286,34.696 ; U8.U31@36.155,27.391 36.155,27.423 v1(36.541,27.809) 37.924,29.191 37.99,29.191 ; U8.V30@36.155,28.31 36.155,28.24 U8.U30@36.545,27.85 ; U8.Y28@36.155,30.149 37.074,30.149 37.075,30.106 v1(37.568,29.613) 37.99,29.191 ; U8.AB26@36.155,31.987 36.253,31.889 36.253,31.532 v1(36.273,31.512) ; U8.AF22@36.157,35.666 U8.AF21@36.615,36.124 ; v1@36.352,31.468 36.556,31.468 U8.AA26@36.615,31.527 36.615,31.584 U8.AA25@37.046,32.015 ; U8.AB25@36.615,32.446 U8.AA25@37.075,31.987 37.985,31.987 U8.Y24@37.99,31.991 ; U8.AJ18@36.615,38.881 U8.AJ16@37.534,39.801 U8.AJ16@37.536,39.802 ; U8.N32@37.534,25.093 v1(37.994,24.633) ; U8.AD21@37.534,35.204 U8.AE21@37.077,35.662 ; v1(37.537,39.802) 37.992,40.258 v1(37.994,40.258) 37.994,40.255 U8.AH15@38.351,39.898 ; U8.AC21@37.994,34.745 37.997,34.745 v1(38.451,35.199) 37.994,35.656 U8.AD20@37.994,35.664 37.986,35.664 U8.AE20@37.533,36.117 ; v1(38.059,32.009) 38.443,32.394 v1(38.443,32.419) ; v1(38.254,27.901) 38.254,27.929 38.454,28.129 U8.T27@38.454,28.77 ; v1(38.361,39.907) U8.AH15@38.351,39.898 ; v1(38.396,30.55) 38.475,30.55 38.913,30.988 U8.V24@38.913,31.068 ; v1(38.477,31.635) 38.82,31.978 v1(38.9,31.978) ; v1(38.656,29.339) U8.T26@38.839,29.156 ; v1(38.833,23.794) 39.212,24.173 U8.K31@39.373,24.173 U8.L31@38.913,24.633 ; U8.AF16@38.913,38.422 38.913,38.412 v1(38.973,38.352) 38.973,38.482 U8.AF15@39.373,38.881 U8.AG15@38.913,39.341 38.397,39.857 38.393,39.857 U8.AH15@38.351,39.898 ; U8.V24@38.955,31.11 38.495,31.57 38.412,31.57 U8.Y24@37.994,31.987 U8.Y24@37.99,31.991 ; v1(38.968,31.047) 38.968,31.053 39.38,31.466 v1(39.385,31.461) ; v1@39.021,38.318 v1(39.376,37.964) ; U8.N29@39.037,26.471 U8.N29@38.913,26.471 U8.M29@39.372,26.012 ; v1@39.057,31.11 39.383,30.784 v1(39.383,30.769) 39.397,30.769 39.695,31.068 U8.U23@39.833,31.068 ; v1(39.37,35.198) v1(39.829,34.738) ; U8.R26@39.373,28.77 U8.R25@39.801,29.197 ; v1(39.373,44.397) U8.AM8@39.832,44.856 ; v1(39.38,29.617) U8.T25@39.419,29.578 ; U8.J32@39.39,23.239 U8.H31@40.276,23.239 ; v1@39.457,30.83 39.833,30.454 U8.T24@39.833,30.149 U8.R24@40.284,29.697 ; v1(39.827,29.223) U8.R25@39.801,29.197 ; v1(39.827,35.653) U8.AA18@40.285,35.195 ; U8.AB18@39.834,35.662 38.911,34.739 39.369,34.281 U8.AA20@39.37,34.28 ; v1(39.855,29.773) 39.827,29.773 39.762,29.707 39.548,29.707 U8.T25@39.419,29.578 ; U8.R25@39.887,29.282 40.374,29.768 40.561,29.768 41.009,30.216 v1(41.035,30.216) ; v1(40.047,22.291) 40.075,22.318 40.275,22.318 U8.G32@40.292,22.335 ; v1(40.234,30.85) 40.252,30.832 40.252,30.801 40.205,30.754 U8.T23@40.205,30.695 ; U8.G32@40.253,22.375 40.253,23.216 U8.H31@40.276,23.239 ; v1(40.286,28.763) U8.P25@40.26,28.737 ; v1(40.287,35.193) U8.AA18@40.285,35.195 ; U8.H31@40.292,23.254 U8.H31@40.276,23.239 ; U8.AE14@40.292,38.881 U8.AF14@39.832,39.341 U8.AF13@40.292,39.801 40.327,39.836 U8.AF12@40.751,40.26 ; U8.G32@40.292,22.335 U8.F31@41.258,22.335 ; U8.AB17@40.292,36.124 U8.AB17@40.352,36.064 ; U8.R24@40.307,29.701 v1(40.344,29.665) ; U8.AG12@40.337,40.675 U8.AF12@40.751,40.26 ; v1(40.356,27.915) U8.N25@40.72,28.278 ; v1(40.746,28.304) U8.N25@40.72,28.278 ; v1(40.747,34.734) 40.745,34.735 v1(40.289,34.278) v1(39.83,33.82) ; U8.AJ9@40.751,43.018 41.629,43.018 U8.AH8@41.67,42.977 ; v1(40.816,27.456) U8.M25@41.179,27.818 ; v1(40.871,36.582) U8.AB16@40.814,36.525 ; v1(41.124,44.375) 41.241,44.257 41.241,43.881 v1(41.262,43.861) ; U8.E32@41.159,21.44 41.245,21.354 42.061,21.354 42.147,21.44 42.595,21.44 42.625,21.41 U8.C30@43.073,21.41 ; v1(41.205,27.844) U8.M25@41.179,27.818 ; U8.W18@41.211,34.285 U8.W19@40.751,33.826 40.749,33.823 U8.W19@40.749,33.819 ; U8.AA16@41.211,36.124 v1(41.214,36.125) ; U8.AG10@41.211,41.639 42.374,41.639 42.387,41.651 42.387,41.383 ; U8.AJ8@41.211,43.478 41.234,43.501 41.234,43.833 v1(41.262,43.861) ; 41.528,40.176 41.528,40.148 41.365,39.985 41.365,39.833 U8.AE12@41.265,39.733 ; U8.L25@41.665,27.385 41.282,27.002 v1(41.282,26.989) ; v1(41.666,33.814) 41.212,33.361 U8.V19@41.206,33.361 ; U8.U19@41.671,32.906 U8.U19@41.671,32.897 ; U8.R21@41.672,31.066 41.672,30.902 41.378,30.608 v1(41.378,30.579) ; v1(41.764,30.97) U8.P21@42.13,30.604 ; 41.824,25.706 41.671,25.859 U8.K26@41.671,26.471 ; v1(42.087,40.498) 42.116,40.498 42.354,40.259 U8.AD10@42.557,40.259 ; v1(42.105,38.894) v1(41.667,39.332) U8.AE12@41.265,39.733 ; U8.C32@42.107,20.572 42.13,20.595 U8.D31@42.13,21.416 ; v1(42.128,31.522) U8.R20@42.205,31.599 ; U8.T19@42.13,32.447 U8.T19@42.133,32.444 ; v1(42.133,35.206) U8.W16@42.13,35.205 U8.W17@41.671,34.745 41.214,35.201 U8.AA17@40.752,35.664 ; U8.AD11@42.132,39.799 U8.AD11@42.13,39.8 U8.AF11@41.211,40.72 ; v1(42.133,35.206) U8.W15@42.589,35.663 ; U8.AD11@42.133,39.798 42.571,39.36 U8.AC11@42.59,39.341 U8.AB11@43.05,38.881 43.09,38.841 U8.AA11@43.509,38.422 U8.AA11@43.509,38.412 ; v1(42.455,25.716) 42.483,25.716 42.779,26.012 43.023,26.012 U8.H25@43.049,26.012 ; v1(42.521,43.496) 42.501,43.516 42.304,43.516 41.859,43.962 ; v1(42.565,26.49) 42.546,26.471 U8.K26@41.671,26.471 ; v1(42.584,33.822) 43.047,34.286 43.054,34.286 v1(43.51,34.742) ; U8.W15@42.59,35.664 U8.W15@42.589,35.663 ; v1(42.591,40.251) U8.AE9@42.59,41.18 ; U8.AK4@42.59,45.776 U8.AK5@42.13,45.316 42.13,44.233 41.859,43.962 ; U8.AK4@42.63,45.816 43.469,45.816 U8.AJ3@43.509,45.776 U8.AH4@43.509,44.856 ; v1(42.937,32.328) 42.931,32.328 U8.R19@42.59,31.987 ; v1@42.943,32.34 v1(42.486,32.796) U8.T19@42.133,32.444 ; v1(42.993,28.711) 43.436,28.269 v1(43.434,28.267) ; v1(43.043,43.458) 43.03,43.458 U8.AG7@42.59,43.018 ; U8.J24@43.05,26.931 43.051,26.931 v1(43.499,27.379) ; v1(43.052,44.857) U8.AH4@43.509,44.856 ; 43.175,26.147 43.175,26.107 43.509,25.774 U8.G25@43.509,25.552 ; U8.Y12@43.505,37.493 v1(43.965,37.034) ; v1(43.7,27.844) 43.7,27.872 43.51,28.062 U8.K22@43.509,28.31 43.051,28.77 v1(41.673,30.148) ; U8.Y11@43.969,37.962 U8.Y11@43.969,37.962 ; v1(44.334,22.358) 44.354,22.338 44.688,22.338 44.691,22.335 U8.B27@44.888,22.335 44.888,23.096 U8.C26@44.814,23.169 ; U8.M18@44.428,31.068 U8.N18@43.969,31.527 43.766,31.527 43.425,31.868 v1(43.396,31.868) 43.394,31.868 43.052,31.525 U8.P19@43.05,31.527 U8.R19@42.59,31.987 ; U8.AG3@44.428,44.856 U8.AH4@43.509,44.856 ; U8.Y10@44.429,38.422 U8.W10@44.888,37.962 ; U8.AE5@44.429,43.018 44.429,42.547 44.421,42.539 ; U8.AG3@44.428,44.856 U8.AF4@44.428,43.937 44.443,43.923 44.888,43.923 ; v1(44.88,42.538) 44.421,42.539 ; U8.AB7@44.884,40.705 44.873,40.705 U8.AB8@44.429,40.26 ; v1(44.887,38.859) U8.Y9@44.891,38.863 ; U8.G22@44.888,26.931 U8.G22@44.888,26.931 44.893,26.931 v1(45.347,27.386) ; U8.AE4@44.888,43.478 44.888,43.923 ; v1(45.343,30.137) 45.338,30.142 v1(44.425,30.142) 43.972,29.689 U8.L20@43.969,29.689 U8.M20@43.509,30.149 U8.N20@43.05,30.608 42.592,31.066 U8.P21@42.13,30.604 ; U8.P14@45.346,33.822 U8.P15@44.888,33.366 v1(44.889,33.363) ; U8.W9@45.348,38.422 U8.W9@45.34,38.414 ; v1(45.347,43.938) 45.332,43.923 44.888,43.923 ; U8.N14@45.806,33.363 U8.N15@45.348,32.906 v1(45.349,32.904) ; U8.L16@45.807,31.528 U8.M15@45.807,32.447 ; U8.M14@46.267,32.906 U8.M15@45.807,32.447 ; v1(46.72,39.781) 46.28,39.341 U8.W7@46.267,39.341 U8.Y8@45.348,39.341 U8.Y8@45.344,39.345 ; v1(46.725,37.029) 45.814,37.94 45.789,37.94 U8.V10@45.345,37.497 ; 46.73,38.047 46.705,38.022 46.705,38.033 46.663,38.075 46.626,38.075 46.375,38.326 46.171,38.326 U8.V9@45.807,37.962 45.796,37.962 45.794,37.961 U8.W9@45.34,38.414 ; 46.756,38.149 46.756,38.262 47.162,38.668 47.162,38.707 ; 47.162,38.733 47.164,38.735 47.379,38.735 47.631,38.987 47.67,38.987 ; U8.V5@47.594,39.749 47.594,39.102 47.67,39.026 47.67,38.987 ; 47.949,38.535 47.949,38.668 47.67,38.948 47.67,38.987 ; R143.2@53.182,67.079 53.222,67.12 57.217,67.12 R139.2@57.22,67.116 57.793,67.116 v1(57.932,66.978) ; v1(54.985,17.219) 55.23,17.464 U10.AB3@55.23,17.752 ; U10.Y1@55.018,19.802 55.374,19.802 v1(55.392,19.784) ; v1@55.417,19.81 55.417,19.798 55.458,19.757 55.983,19.757 U10.W2@56.043,19.696 ; v1(55.452,20.964) 55.472,20.944 55.715,20.944 U10.V1@55.937,20.722 ; v1(56.069,22.77) 56.09,22.75 56.09,22.172 56.306,21.955 56.306,21.943 56.608,21.641 U10.T1@56.856,21.641 ; v1(56.103,16.203) 56.103,16.362 U10.AB5@56.361,16.62 ; v1(56.738,17.576) 56.758,17.555 56.974,17.555 56.989,17.54 U10.Y5@57.281,17.54 ; v1(57.17,19.048) 57.17,18.57 U10.W4@57.175,18.565 ; U10.P1@57.776,22.56 57.808,22.528 v1@58.236,22.528 ; U10.T3@57.988,20.51 57.993,20.504 57.993,20.003 v1(58.014,19.982) ; U10.AB8@58.059,14.923 58.06,14.925 58.06,15.389 v1(58.08,15.409) ; v1(58.113,18.997) 58.133,18.977 58.133,18.668 58.2,18.601 U10.V5@58.2,18.459 ; v1(58.313,22.553) 58.412,22.454 U10.N2@58.801,22.454 ; U10.P3@58.907,21.429 58.954,21.382 59.143,21.382 v1(59.171,21.354) ; U10.Y8@58.978,15.843 v1(58.978,16.279) ; U10.T5@59.119,19.378 59.119,19.934 v1(59.137,19.952) ; U10.AB10@59.19,13.792 59.19,13.46 v1(59.202,13.448) ; v1@59.227,21.359 59.227,21.337 59.238,21.326 59.847,21.326 59.851,21.323 U10.N4@59.932,21.323 ; v1(59.583,17.228) 59.583,17.205 59.712,17.075 59.712,16.946 U10.V8@59.897,16.762 ; U10.W9@60.003,15.737 60.026,15.76 60.232,15.76 v1(60.26,15.788) ; v1(60.072,17.854) 60.245,17.681 U10.T8@60.816,17.681 ; U10.J1@60.074,24.858 60.139,24.793 60.139,24.232 v1(60.167,24.204) 60.18,24.191 U10.K2@60.18,23.833 ; v1(60.766,9.401) 60.766,9.513 61.157,9.904 Q1.2@63.979,9.904 ; U10.G1@60.993,25.777 60.994,25.779 v1@61.488,25.779 ; v1(61.128,14.199) 61.134,14.205 U10.W11@61.134,14.605 ; v1(61.235,13.079) 61.24,13.084 U10.Y12@61.24,13.58 ; U10.K4@61.311,22.702 61.324,22.714 61.324,23.608 U10.J3@61.205,23.727 61.776,23.727 v1(61.782,23.72) ; v1(61.538,26.973) 61.642,26.869 61.714,26.869 61.886,26.697 U10.E1@61.912,26.697 ; U10.T10@61.948,16.55 62.487,16.55 v1(62.504,16.533) ; v1(62.046,25.093) 62.124,25.015 U10.G3@62.124,24.646 ; v1(62.156,14.036) 62.16,14.04 U10.V12@62.16,14.499 ; U10.N9@62.761,18.494 62.761,17.546 v1(62.783,17.524) 62.812,17.524 U10.P10@62.867,17.469 ; U10.C1@62.831,27.616 62.79,27.575 62.79,26.948 v1(62.763,26.921) 62.763,26.882 62.938,26.706 U10.D2@62.938,26.591 ; U10.T12@63.079,15.418 63.539,14.958 63.926,14.958 64.332,15.365 64.332,15.746 64.243,15.746 64.078,15.91 v1@64.078,15.924 ; U10.G5@63.256,23.515 63.263,23.507 63.263,23.114 v1(63.291,23.086) ; v1(63.657,24.511) 63.677,24.491 64.118,24.491 U10.E5@64.175,24.434 ; U10.N11@63.892,17.363 63.892,17.388 v1(63.902,17.398) ; U10.P12@63.998,16.338 63.998,15.951 v1(64.025,15.924) ; U10.D4@64.069,25.459 64.145,25.535 64.688,25.535 64.7,25.548 64.914,25.548 v1(64.942,25.576) 64.942,25.505 U10.C5@65.094,25.353 ; v1(64.14,19.873) 64.599,19.873 64.705,19.767 U10.J10@65.165,19.767 ; U10.A3@64.882,27.404 64.889,27.411 64.889,27.783 v1(64.917,27.811) ; v1(64.942,22.299) 64.953,22.288 U10.G8@64.953,21.818 ; U10.K11@65.271,18.742 65.377,18.636 66.742,18.636 v1(66.753,18.624) ; v1(65.475,23.213) 65.7,22.989 65.7,22.935 65.872,22.763 U10.E8@65.872,22.737 ; v1(66.044,20.078) 66.064,20.098 66.064,20.667 U10.G10@66.084,20.686 ; U10.C8@66.791,23.656 66.897,23.55 v1@66.897,23.071 ; v1(66.893,23.071) v1@66.897,23.071 ; U10.G12@67.216,19.555 v1(67.652,19.555) ; 67.355,22.634 67.351,22.631 U10.D9@66.897,22.631 v1@66.897,23.071 ; U10.D11@68.029,21.499 68.948,21.499 U10.C12@69.054,21.393 69.531,21.393 v1(69.539,21.385) ; U10.E12@68.135,20.474 68.469,20.14 v1(68.498,20.14) 68.537,20.14 68.994,19.683 69.997,19.683 v1@71.876,21.562 ; v1(68.29,13.048) 68.29,13.029 R50.1@68.296,13.023 ; U10.A10@68.842,23.444 69.233,23.444 v1(69.235,23.442) ; U16.3@9.616,15.246 9.518,15.246 9.155,14.883 9.146,14.883 8.964,14.701 8.964,13.891 9.146,13.709 9.155,13.709 9.518,13.346 U16.1@9.743,13.346 ; 13.272,27.491 13.602,27.16 ; U8.AJ22@34.776,37.043 U8.AJ22@34.776,37.043 35.239,36.582 v1(35.696,37.038) 35.843,36.89 35.849,36.89 U8.AG21@36.155,36.583 ; U8.AF24@35.286,34.696 U8.AE24@35.696,34.285 U8.AD24@36.156,33.826 U8.AB24@37.075,32.906 U8.AA24@37.534,32.447 ; U8.AG21@36.155,36.583 U8.AF21@36.615,36.124 ; U8.AF21@36.615,36.124 U8.AE21@37.075,35.664 U8.AE21@37.077,35.662 ; U8.AE21@37.077,35.662 U8.AE20@37.533,36.117 ; U8.AE20@37.533,36.117 v1(38.448,37.032) v1(38.448,37.032) 39.376,37.959 v1(39.376,37.964) ; U8.AA24@37.534,32.447 U8.Y24@37.99,31.991 ; U8.AA24@37.534,32.447 U8.AA23@37.994,32.906 ; 37.99,29.191 38.411,28.77 U8.T27@38.454,28.77 ; U8.AA23@37.994,32.906 U8.Y23@38.454,32.447 U8.W23@38.913,31.987 U8.U23@39.833,31.068 ; U8.AA23@37.994,32.906 U8.AA22@38.454,33.366 39.367,34.28 U8.AA20@39.37,34.28 ; U8.T27@38.454,28.77 U8.T26@38.913,29.229 39.135,29.451 39.292,29.451 U8.T25@39.419,29.578 ; U8.AA20@39.37,34.28 39.372,34.281 v1(39.829,34.738) ; U8.AA20@39.37,34.28 v1(39.83,33.82) ; v1(39.376,37.964) v1(39.835,37.504) v1(40.295,37.044) U8.AB16@40.814,36.525 ; U8.T25@39.419,29.578 U8.R25@39.801,29.197 ; U8.R25@39.801,29.197 U8.P25@40.26,28.738 ; v1(39.829,34.738) U8.AA18@40.285,35.195 ; v1(39.83,33.82) 40.284,33.366 U8.W20@40.292,33.366 40.296,33.366 U8.W19@40.749,33.819 ; U8.U23@39.833,31.068 40.196,30.704 U8.T23@40.205,30.695 ; U8.T23@40.205,30.695 U8.T23@40.292,30.608 U8.R23@40.752,30.149 U8.R22@41.211,30.608 41.328,30.608 41.357,30.579 v1(41.378,30.579) ; U8.P25@40.26,28.737 39.836,28.314 39.836,28.158 40.113,28.158 v1(41.282,26.989) ; U8.P25@40.26,28.737 U8.N25@40.72,28.278 ; U8.AA18@40.285,35.195 40.752,35.661 U8.AA17@40.752,35.664 ; U8.AB17@40.352,36.064 U8.AA17@40.752,35.664 ; U8.AB17@40.352,36.064 U8.AB16@40.814,36.525 ; U8.N25@40.72,28.278 U8.M25@41.179,27.819 ; U8.W19@40.749,33.819 U8.V19@41.206,33.361 ; U8.AF12@40.751,40.26 40.751,40.247 U8.AE12@41.265,39.733 ; U8.AF12@40.751,40.26 U8.AF11@41.211,40.72 ; U8.AB16@40.814,36.525 v1(41.214,36.125) v1(41.674,35.666) 41.675,35.665 U8.Y11@43.969,37.962 ; U8.V19@41.206,33.361 U8.U19@41.671,32.897 ; U8.AF11@41.211,40.72 41.724,40.72 42.387,41.383 ; v1(41.262,43.861) 41.289,43.889 41.622,43.889 U8.AJ7@41.67,43.937 ; v1(41.282,26.989) 41.282,26.86 U8.K26@41.671,26.471 ; v1(41.378,30.579) 41.378,30.551 41.563,30.367 41.563,30.258 v1(41.673,30.148) ; U8.U19@41.671,32.897 41.671,32.869 v1(41.303,32.501) v1(41.745,32.059) ; U8.AH8@41.67,42.977 U8.AJ7@41.67,43.937 ; U8.AH8@41.67,42.977 v1(41.697,42.95) 41.764,43.018 U8.AG7@42.59,43.018 ; U8.AJ7@41.67,43.937 41.695,43.962 41.859,43.962 ; v1(41.673,30.148) v1(41.673,30.148) U8.P21@42.13,30.604 ; v1(41.745,32.059) U8.R20@42.205,31.599 ; v1(41.745,32.059) 41.749,32.059 U8.T19@42.133,32.444 ; U8.R20@42.205,31.599 42.59,31.984 U8.R19@42.59,31.987 ; 42.387,41.383 U8.AE9@42.59,41.18 ; U8.W15@42.589,35.663 U8.V15@43.049,35.204 v1(43.05,35.202) v1(43.51,34.742) ; U8.AE9@42.59,41.18 U8.AE8@43.05,41.639 ; U8.AG7@42.59,43.018 43.045,42.562 U8.AF7@43.045,42.543 ; U8.AF7@43.045,42.543 v1(43.505,42.084) 43.507,42.084 v1(43.962,42.539) 44.421,42.539 ; U8.AF7@43.045,42.543 43.01,42.543 42.565,42.099 U8.AF8@42.59,42.099 U8.AE8@43.05,41.639 ; U8.AE8@43.05,41.639 U8.AD8@43.509,41.179 U8.AB8@44.429,40.26 ; v1(43.51,34.742) v1(43.97,34.282) v1(44.429,33.823) v1(44.889,33.363) ; U8.Y11@43.969,37.962 44.882,37.049 v1(44.882,37.033) U8.V10@45.345,37.497 ; U8.AB8@44.429,40.26 U8.AA8@44.888,39.801 U8.Y8@45.344,39.345 ; U8.W10@44.888,37.962 44.888,37.954 U8.V10@45.345,37.497 ; U8.W10@44.888,37.962 U8.W9@45.34,38.414 ; v1(44.889,33.363) v1(45.349,32.904) ; U8.Y9@44.891,38.863 U8.W9@45.34,38.414 ; U8.Y9@44.891,38.863 44.887,38.868 44.887,38.87 45.115,39.098 45.115,39.116 U8.Y8@45.344,39.345 ; v1(45.349,32.904) 45.35,32.904 U8.M15@45.807,32.447
  Top Layer w0.35: U8.AF29@32.938,32.447 U8.AF28@33.398,32.906 U8.AF27@33.857,33.366 U8.AE26@34.776,33.366 34.76,33.382 v1(34.76,34.29)
  Top Layer w0.356: v1(0.07,57.399) 0.081,57.41 0.807,57.41 1.205,57.808 2.832,57.808 R64.1@3.398,58.374 ; v1(0.299,23.925) 0.299,23.132 1.01,22.421 4.073,22.421 4.455,22.039 4.455,21.994 R137.2@4.776,21.673 4.455,21.353 4.455,21.307 4.094,20.946 4.094,19.37 4.498,18.967 U24.1@4.498,15.096 ; v1(0.431,58.842) 0.438,58.835 1.283,58.835 C231.2@1.29,58.829 ; U19.1@5.822,8.263 5.832,8.254 5.832,7.13 U18.1@5.841,7.12 5.841,7.07 7.095,5.816 v1(7.095,4.224) ; U14.3@7.394,9.638 7.619,9.638 7.99,10.008 ; U14.1@7.394,11.538 U14.1@7.619,11.538 ; U16.1@9.743,13.346 9.621,13.224 9.305,13.224 U14.1@7.619,11.538 ; v1(12.128,11.312) 12.128,12.213 12.195,12.28 12.195,14.717 ; v1(13.02,10.48) 13.008,10.48 11.587,9.058 9.153,9.058 8.99,9.222 8.99,9.225 8.598,9.617 8.381,9.617 7.99,10.008 ; v1(13.151,20.572) 13.674,20.05 13.674,18.512 U12.9@15.056,17.129 U12.9@14.606,17.129 ; v1(34.461,41.986) 34.461,41.971 34.777,41.656 U8.AP17@34.777,41.639 ; U8.AL13@37.957,42.162 38.453,41.666 U8.AK13@38.453,41.639 38.453,41.634 v1(37.982,41.163) 37.982,40.318 U8.AJ15@38.018,40.282 ; U8.AL11@38.913,42.964 U8.AK11@39.345,42.531 ; U8.AF15@39.373,38.881 U8.AF14@39.832,39.341 ; 39.438,38.707 39.453,38.707 39.738,38.422 U8.AE15@39.832,38.422 39.851,38.422 U8.AE13@40.743,39.314 ; v1(39.748,42.902) 39.716,42.902 U8.AK11@39.345,42.531 ; U8.AG12@40.292,40.72 U8.AK12@38.913,42.099 U8.AK11@39.345,42.531 ; U8.AF13@40.327,39.836 40.327,39.758 U8.AE13@40.722,39.363 ; 40.555,24.646 40.57,24.646 41.017,25.093 U8.J28@41.211,25.093 ; U8.AE13@40.69,39.339 40.699,39.339 U8.AE13@40.722,39.363 ; v1(40.723,43.36) 40.733,43.35 41.01,43.35 41.047,43.313 U8.AJ8@41.211,43.478 ; U8.AE13@40.751,39.341 41.144,39.733 U8.AE12@41.265,39.733 ; U8.K28@40.752,25.552 U8.K27@41.211,26.012 41.624,26.012 41.665,26.053 ; U8.AE13@40.757,39.328 40.748,39.337 U8.AE13@40.722,39.363 ; U8.AG10@41.211,41.639 41.198,41.625 40.309,41.625 40.296,41.639 40.237,41.639 39.805,42.072 U8.AK11@39.345,42.531 ; v1(41.667,39.332) 42.133,39.798 42.586,40.251 v1(42.591,40.251) v1(43.026,39.815) ; v1(41.669,46.705) 41.883,46.705 42.134,46.454 v1@42.163,46.454 ; v1(41.931,68.304) 41.941,68.293 42.646,68.293 43.102,67.837 43.102,67.297 R134.1@43.174,67.225 ; v1(42.105,38.894) v1(42.563,39.352) 42.571,39.36 v1(43.026,39.815) ; U8.AK5@42.13,45.316 U8.AL5@41.671,45.776 42.163,46.268 42.163,46.21 42.236,46.21 U8.AK4@42.63,45.816 ; v1(42.154,46.449) 42.247,46.356 v1@42.249,46.356 ; v1@42.348,46.454 v1(42.589,46.695) ; v1(42.565,26.49) 42.571,26.49 U8.J25@42.59,26.471 U8.J25@42.609,26.49 ; v1(42.993,28.711) 43.051,28.77 43.28,28.998 43.28,29.001 U8.L21@43.509,29.23 43.509,29.265 43.596,29.353 43.695,29.254 43.695,29.219 43.93,28.984 v1@43.93,28.981 ; v1(43.082,38.833) 43.09,38.841 v1(43.546,39.296) ; 43.175,26.107 43.156,26.127 42.793,26.49 U8.J25@42.609,26.49 ; U8.AA11@43.509,38.412 v1(43.969,38.872) ; v1(43.594,29.353) U8.L21@43.595,29.351 ; v1(43.923,28.976) 43.926,28.976 44.292,28.61 U8.J21@44.292,28.31 ; U8.Y10@44.429,38.422 44.42,38.422 v1(43.969,38.872) ; v1(44.88,42.538) U8.AC5@45.339,42.078 ; U8.AB7@44.884,40.705 45.808,41.628 U8.AB5@45.808,41.639 ; U8.F23@44.888,26.012 44.968,26.091 44.969,26.091 U8.F22@45.348,26.471 U8.F20@46.268,27.39 ; U8.F23@44.95,26.012 v1(45.016,25.946) ; v1@45.016,25.933 45.016,25.885 U8.D23@45.801,25.099 ; v1(45.275,24.603) 45.318,24.603 U8.D24@45.348,24.633 45.348,24.646 U8.D23@45.801,25.099 ; U8.AB6@45.341,41.16 U8.Y6@46.254,40.247 ; v1(45.343,30.137) U8.J18@45.799,29.681 ; U8.J19@45.345,29.225 U8.J18@45.8,29.68 ; U8.F22@45.348,26.471 U8.G22@44.888,26.931 v1(44.43,27.39) 44.153,27.39 v1(43.7,27.844) ; v1@45.533,42.558 U8.AC4@45.807,42.558 ; U8.T11@45.807,36.123 U8.P11@46.726,35.204 U8.N11@47.186,34.745 47.186,34.587 v1(47.614,34.159) ; U8.D23@45.808,25.093 U8.C23@46.267,24.633 46.267,24.642 46.502,24.876 v1(46.502,24.915) 46.541,24.915 46.718,25.093 U8.C22@46.727,25.093 U8.C20@47.646,26.012 48.504,26.012 U8.B19@48.508,26.007 ; v1(45.851,41.639) U8.AB5@45.808,41.639 ; v1(45.945,25.202) 45.905,25.202 U8.D23@45.801,25.099 ; U8.B24@46.267,23.778 U8.B24@46.273,23.772 ; U8.F19@46.724,27.844 46.724,26.934 U8.E20@46.727,26.931 ; v1(46.725,37.029) 46.732,37.029 U8.P9@47.648,36.114 ; U8.Y5@46.727,40.72 U8.Y6@46.267,40.26 46.266,40.259 46.266,40.247 U8.Y6@46.254,40.247 ; v1(46.73,30.61) U8.J15@47.186,31.068 U8.J14@47.646,31.527 U8.J13@48.105,31.987 U8.J11@49.025,32.906 49.476,33.357 49.485,33.357 49.935,32.906 U8.H10@49.944,32.906 U8.G10@50.404,32.447 50.798,32.053 U8.F10@50.87,32.053 ; U8.F19@46.756,27.862 45.395,29.222 v1(45.345,29.222) 44.292,28.17 44.292,28.16 v1(44.303,28.15) 44.288,28.15 43.988,27.85 43.706,27.85 v1(43.7,27.844) ; U8.R9@47.186,36.583 47.632,37.029 47.642,37.029 v1(48.102,36.569) v1(48.102,36.569) U8.P9@47.648,36.114 ; U8.AA3@47.186,42.099 47.186,42.153 46.999,42.34 v1(46.999,42.355) 46.985,42.355 46.781,42.558 U8.AB3@46.727,42.558 46.639,42.646 46.639,42.688 46.474,42.853 46.432,42.853 U8.AC3@46.267,43.018 45.993,43.018 45.528,42.553 v1(45.514,42.553) 45.503,42.543 45.503,42.258 45.339,42.094 U8.AC5@45.339,42.078 ; U8.V5@47.637,39.781 v1(46.72,39.781) U8.Y6@46.254,40.247 ; U8.J14@47.645,31.524 U8.H14@48.104,31.064 ; v1(47.644,36.11) U8.P9@47.648,36.114 ; U8.E18@47.67,27.839 47.896,27.839 48.154,27.581 48.154,27.568 ; 47.67,28.726 48.565,29.621 U8.F15@48.565,29.689 ; U8.V5@47.67,39.774 48.105,40.21 U8.V4@48.105,40.26 U8.V3@48.565,40.72 ; v1(48.015,41.661) 48.015,41.647 48.102,41.56 48.102,41.182 U8.V3@48.565,40.72 ; 48.102,46.531 48.223,46.652 48.223,48.738 48.102,48.86 v1(48.102,51.001) 48.102,51.014 48.737,51.649 v1(48.737,51.661) 48.75,51.661 49.486,52.398 v1(49.499,52.398) 56.458,59.358 v1(56.649,59.358) 57.754,59.358 58.744,58.367 58.871,58.367 65.634,51.604 65.647,51.604 66.554,50.697 66.658,50.697 v1(66.668,50.687) ; 48.104,30.313 48.565,29.852 ; U8.W3@48.105,41.18 U8.W2@48.565,41.639 U8.W2@48.565,41.639 ; 48.148,27.561 48.148,27.543 48.447,27.244 v1(48.447,27.229) 48.462,27.229 48.642,27.049 v1@48.805,27.049 ; R146.2@48.224,2.07 48.296,1.997 48.546,1.997 49.346,1.197 52.717,1.197 R124.1@52.73,1.209 ; U8.B19@48.559,26.033 48.565,26.039 U8.C18@48.565,26.931 48.803,26.931 v1@48.863,26.991 ; U8.J12@48.565,32.446 U8.H12@49.025,31.987 ; 49.025,27.232 U8.C17@49.025,27.391 ; U8.P6@49.025,37.503 U8.N6@49.409,37.118 ; U8.C17@49.092,27.458 U8.C16@49.485,27.85 ; U8.K9@49.485,34.272 49.534,34.223 49.534,34.204 49.931,33.807 49.931,33.754 49.575,33.399 U8.J10@49.499,33.399 ; U8.N6@49.485,37.043 U8.N6@49.409,37.118 ; U8.K9@49.488,34.274 49.026,34.735 49.026,34.743 U8.M9@48.565,35.205 48.557,35.205 U8.P9@47.648,36.114 ; U8.K9@49.499,34.339 49.538,34.339 49.93,34.731 U8.K8@49.94,34.731 ; U8.C16@49.559,27.91 49.944,28.295 U8.C15@49.944,28.31 U8.F15@48.565,29.689 ; U8.F13@49.581,30.62 49.552,30.62 v1(48.979,30.047) 48.76,30.047 48.565,29.852 ; U8.M6@49.905,36.599 49.651,36.853 v1(49.398,37.107) U8.N6@49.409,37.118 ; U8.M6@49.944,36.584 U8.J6@51.332,35.196 ; U8.C15@49.981,28.37 50.006,28.37 v1(50.861,29.225) ; U8.F11@50.404,31.527 50.886,32.009 50.906,32.009 50.906,32.029 U8.F9@51.323,32.447 ; U8.C13@50.921,29.284 50.921,29.287 51.122,29.488 U8.C12@51.323,29.689 51.323,29.713 v1(51.389,29.779) ; U8.J6@51.321,35.189 51.328,35.196 U8.J6@51.332,35.196 ; U8.C12@51.323,29.697 51.583,29.957 51.774,30.148 U8.C11@51.782,30.148 51.811,30.148 52.7,31.038 v1(52.7,31.081) 53.164,31.545 U8.C8@53.207,31.545 ; U8.J6@51.378,35.278 51.397,35.278 U8.J5@51.783,35.664 U8.J4@52.242,36.123 U8.J3@52.702,36.583 ; U8.H6@51.783,34.745 51.783,34.757 51.827,34.801 51.827,34.888 51.867,34.929 ; U8.E8@52.193,32.508 U8.E8@52.242,32.459 ; U8.K3@52.242,37.043 51.918,37.367 U8.L3@51.782,37.503 U8.M3@51.323,37.962 51.093,38.192 U8.N3@50.863,38.422 50.651,38.633 U8.R3@49.944,39.341 U8.U3@49.025,40.26 48.58,40.704 U8.V3@48.565,40.72 ; U8.E8@52.242,32.447 53.119,31.57 U8.C8@53.156,31.57 ; U8.K3@52.242,37.043 U8.J3@52.702,36.583 ; U8.F7@52.318,33.424 52.384,33.49 v1(52.384,34.117) 53.179,33.323 53.205,33.323 U8.C6@54.069,32.459 ; U8.G6@52.347,34.189 52.347,34.449 52.132,34.664 51.917,34.879 51.867,34.929 ; U8.C8@53.207,31.57 53.207,31.573 U8.C7@53.621,31.987 ; U8.G3@53.563,35.736 53.549,35.736 U8.H3@53.161,36.124 U8.J3@52.702,36.583 ; U8.G3@53.621,35.664 54.08,35.205 U8.C3@55.458,33.826 ; U8.C7@53.639,31.993 U8.C6@54.079,32.434 ; U8.C5@54.532,32.886 U8.C6@54.079,32.434 ; U8.B6@54.54,31.987 54.094,32.434 U8.C6@54.079,32.434 ; U8.C5@54.54,32.906 54.554,32.906 v1(54.637,32.99) ; U8.C5@54.631,32.997 U8.C4@55,33.366 55.392,33.758 U8.C3@55.392,33.831 ; v1(60.675,34.059) 60.7,34.059 60.954,34.313 v1(62.859,34.313) v1(65.653,34.313) ; v1(62.176,53.634) 62.194,53.652 62.475,53.652 v1(63.024,54.201) ; U10.N9@62.761,18.494 62.89,18.623 63.171,18.623 v1(63.189,18.641) ; v1(66.441,34.085) 66.43,34.095 65.886,34.095 65.668,34.313 v1(65.653,34.313) ; v1@66.644,50.671 67.33,49.985 67.977,49.985 v1(68.687,49.276) ; v1@67.33,33.754 72.918,28.166 v1@72.918,21.41 ; v1(68.3,38.615) 68.302,38.612 68.302,36.988 v1(67.431,36.117) 66.539,35.224 66.539,35.199 v1(65.653,34.313) ; v1@68.302,38.615 v1(68.302,40.242) v1(69.878,41.818) v1(71.455,43.394) ; v1@68.68,49.269 69.222,48.728 v1(69.222,48.029) ; v1@69.228,48.036 v1@69.978,47.286 ; v1(69.984,47.293) 70.002,47.275 70.078,47.275 v1(70.949,46.404) ; v1@70.905,46.359 v1@71.775,45.489 ; U14.1@7.619,11.538 7.99,11.167 8.035,11.167 8.199,11.003 8.199,10.172 8.035,10.008 7.99,10.008 ; U8.J28@41.211,25.093 U8.J27@41.671,25.552 41.824,25.706 42.444,25.706 v1(42.455,25.716) 42.455,25.701 42.215,25.462 42.215,25.178 U8.H28@41.671,24.633 U8.J28@41.211,25.093 ; U8.J25@42.609,26.49 42.922,26.803 42.926,26.803 43.501,27.378 43.501,27.63 43.7,27.829 v1(43.7,27.844) ; v1(43.026,39.815) v1(43.969,38.872) ; U8.AC5@45.339,42.078 45.778,41.639 U8.AB5@45.808,41.639 ; U8.F15@48.565,29.689 48.565,29.852 ; U8.J6@51.332,35.196 51.344,35.196 51.571,34.969 51.827,34.969 51.864,34.932 51.867,34.929
  Top Layer w0.508: -0.481,28.751 -0.684,28.547 -0.684,26.538 -0.445,26.3 -0.352,26.3 0.093,25.855 v1(0.121,25.855)
  Layer 4 w0.305: v1@38.219,58.006 38.219,57.986 39.769,57.986 40.025,58.242 v1(40.054,58.242)